# Altium PCB Tablet_Design.PcbDoc (part 5 of 6)
Units mil, origin at the board's own origin, x right, y up, seen from the top; angles counter-clockwise.
Board outline 3823 x 4035 mil, 2 copper layers (Top Layer, Bottom Layer), stack 57 mil thick; 254 components, 256 nets, 1099 pads, 445 vias.
Unrouted connection lines stored in the file: 188.
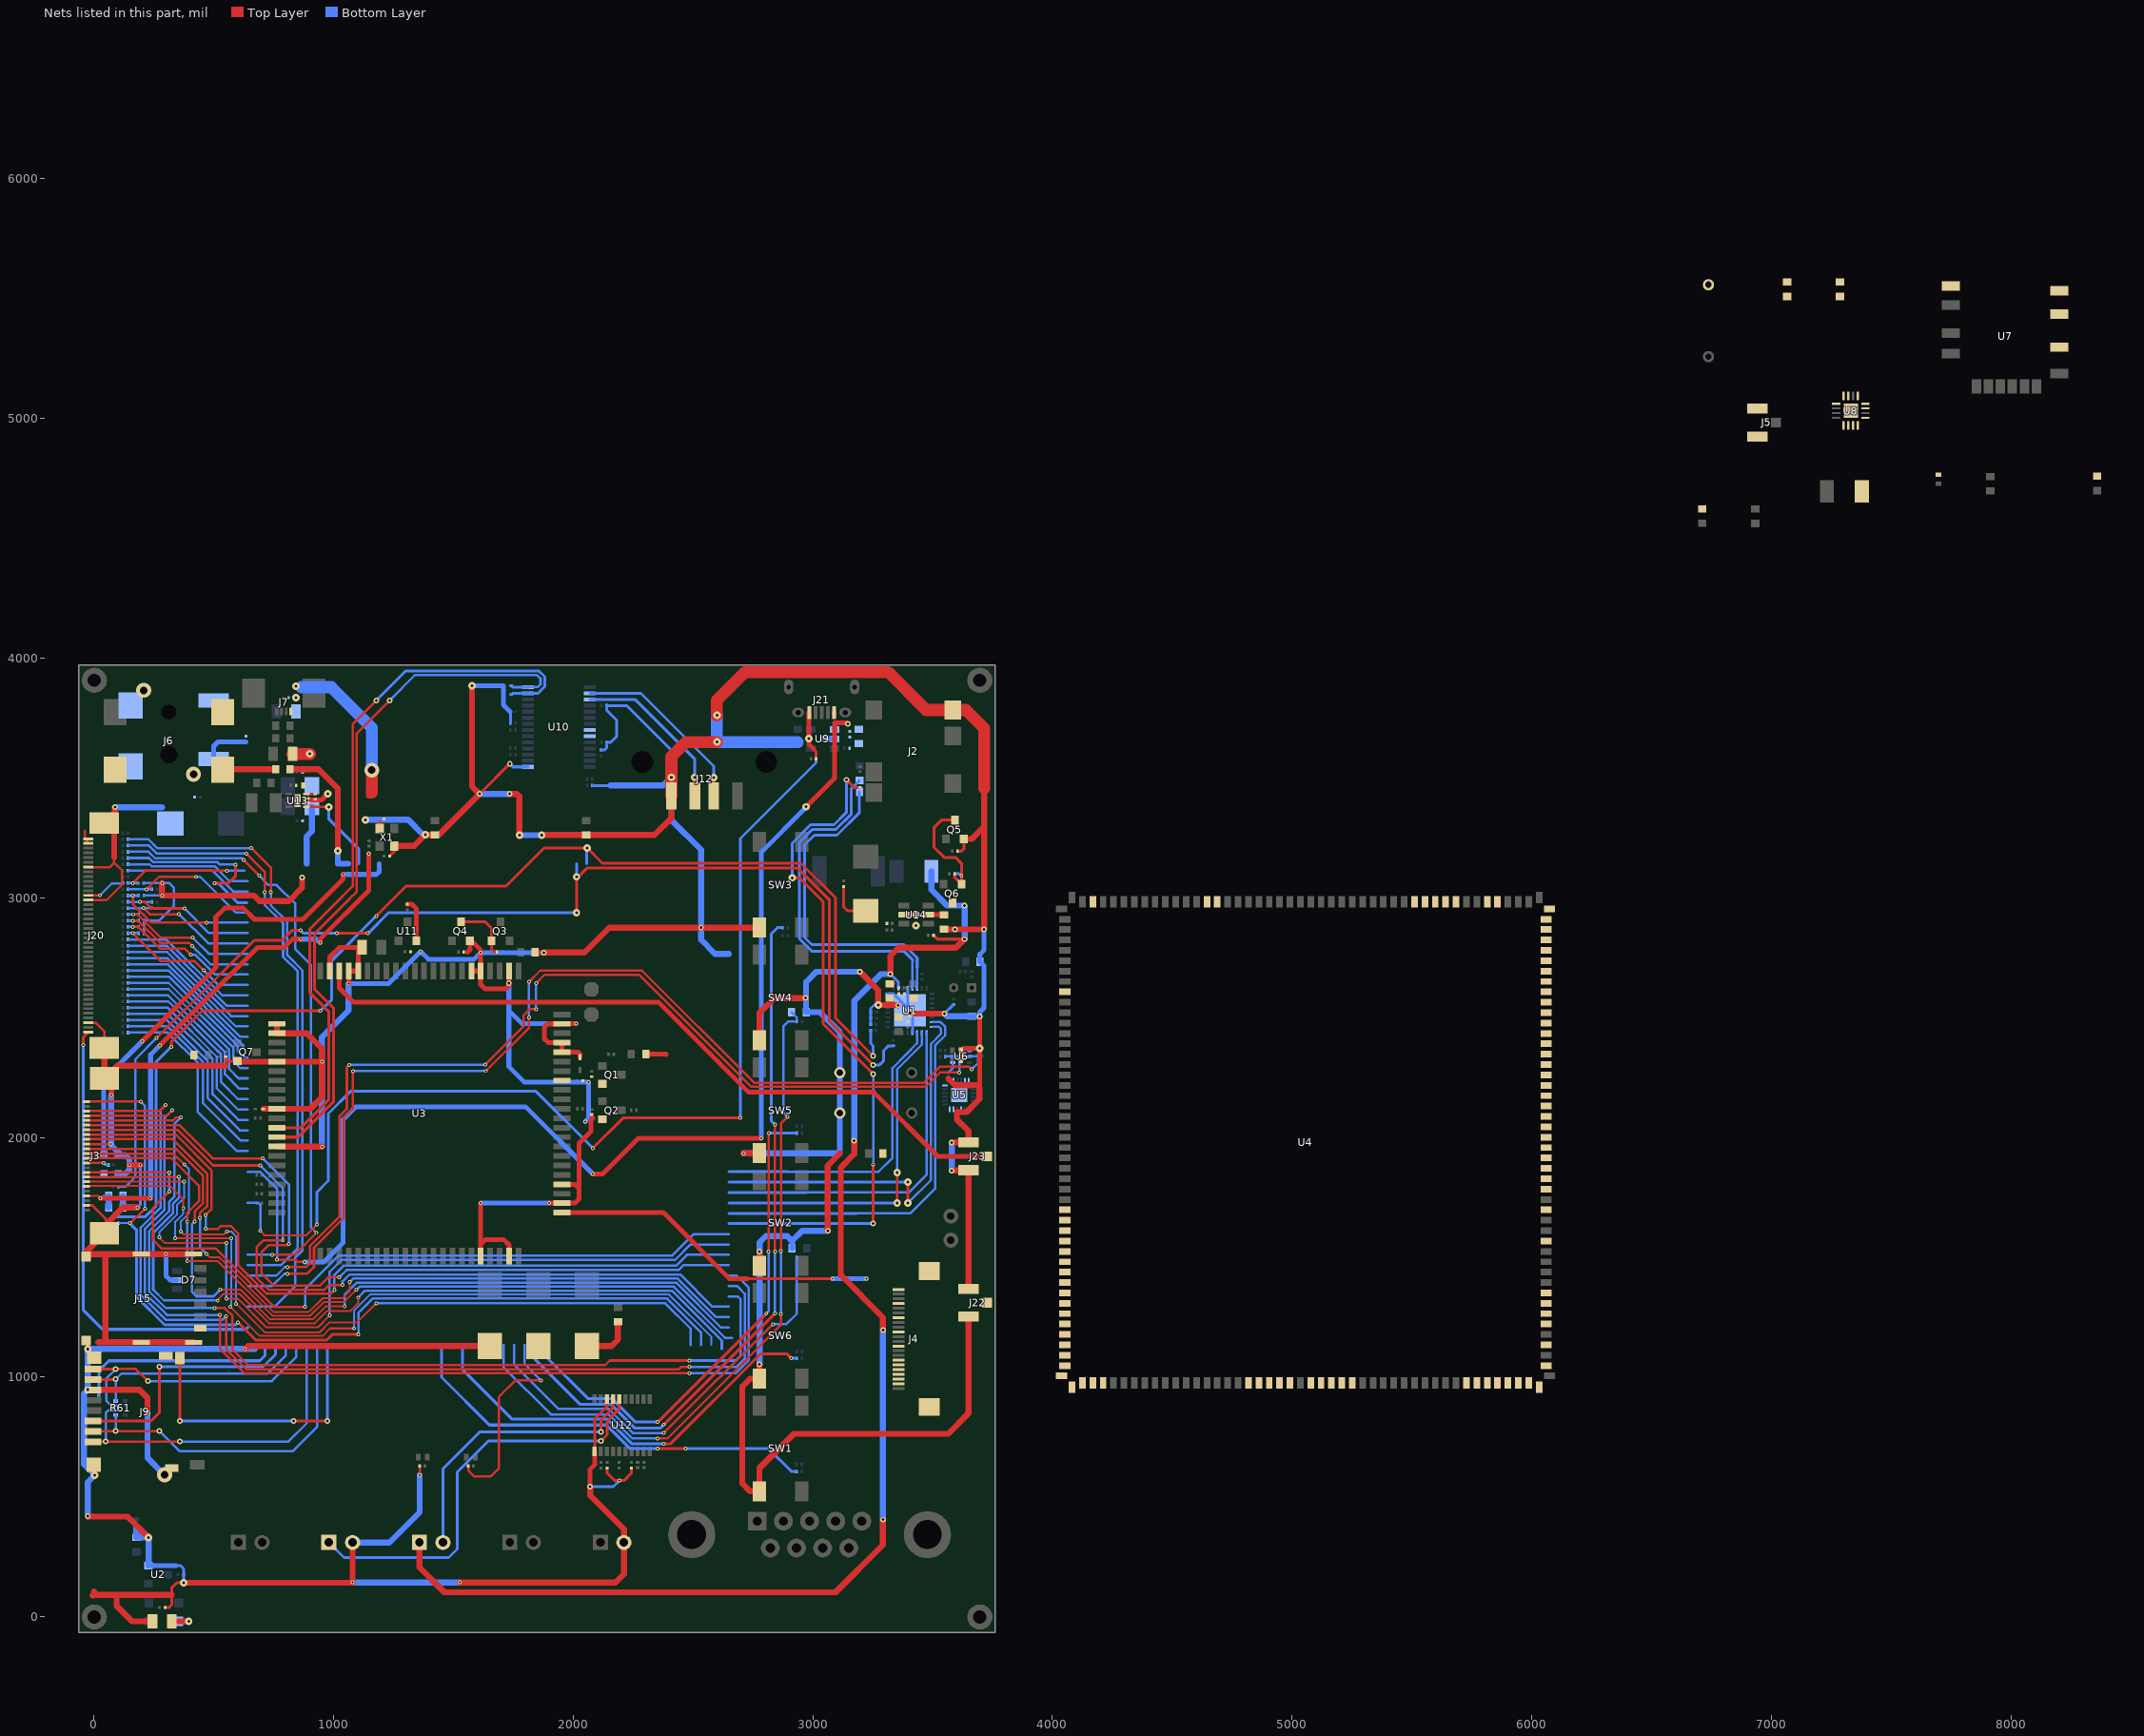
[diagram p2: the nets of this part, all layers, seen from the top]

## Via types
v1: diameter 15.75, hole 7.87, Top Layer to Bottom Layer, tented both sides, 264 vias
v2: diameter 23.62, hole 11.81, Top Layer to Bottom Layer, tented both sides, 101 vias
v3: diameter 31.5, hole 11.81, Top Layer to Bottom Layer, tented both sides, 73 vias
v4: diameter 62.99, hole 31.5, Top Layer to Bottom Layer, tented both sides, 7 vias

## Nets (pads, with @x,y where several pads share a name; then routed paths per layer and width w, separated by ;. In a path a pad name is that pad's centre, name@x,y a point inside that pad or via, vN(x,y) a via of type N, cw(c..) or ccw(c..) an arc to the next point about the centre after c; other vN are vias at no path point) (continued)
GND: (continued)
  Top Layer w12: C13.2@297.81,38 313,38 325.25,50.25 325.25,91.57 325.25,121.25 346,142 v3(375,142) ; 551,2317 551,2328 560.4,2318.6 Q7.2@599.63,2318.6 ; C65.1@1234.81,3174 1253.51,3192.7 X1.2@1253.51,3215.58 ; v2(1610,3432.83) 1610,3433 v2(1736,3559) ; U12.1@2089.84,689.75 2089.84,824.84 2141.02,876.02 U12.18@2141.02,908.25 ; C80.2@2141.19,621.19 2141.19,600.81 2174,568 v1(2193,568) 2212,568 2243.39,599.39 C81.2@2243.39,621.19 ; 3002.5,3621.5 3013.83,3610.17 R68.2@3013.83,3580 ; C91.2@3129,3046.19 3129,2961 3145,2945 C90.2@3221,2945 ; R132.2@3603.66,3194 3620,3194 3630.07,3204.07 Q5.2@3630.07,3244.63
  Top Layer w20: 896,3408 951,3408 v3(977,3434) ; U3.80@984.78,2694 984.78,2752.78 1025,2793 C28.2@1120,2793.04 ; v1@1063.52,2641 U3.78@1063.52,2694 U3.77@1102.89,2694 1102.89,2775.93 C28.2@1120,2793.04 ; C28.2@1120,2793.04 C28.2@1120,2793.04 ; 1147.2,3425.53 1148,3424.73 ; X1.4@1192.49,3288.42 1192.49,3310.3 ; C78.2@1309,2972.81 1327.19,2972.81 1346.4,2953.6 U11.2@1346.4,2820.63 ; 1559,2772 1569.4,2782.4 Q4.2@1569.4,2820.63 1575.37,2820.63 1614.7,2781.3 v1(1614.7,2771) U3.64@1614.7,2694 ; U3.65@1575.33,2694 U3.64@1614.7,2694 ; U3.37@1614.7,1505.02 1614.7,1554 ; v1@1614.7,1725 1614.7,1554 ; U3.40@1732.81,1505.02 1732.81,1551.19 1710,1574 1634.7,1574 1614.7,1554 ; v2@1732.81,2633.81 1719,2620 1632,2620 1614.7,2637.3 U3.64@1614.7,2694 ; v2@1732.81,2643 U3.61@1732.81,2694 ; C27.1@1842,2772 1843,2771 v2(1878,2771) ; v1(1900,1725.5) U3.41@1953.28,1725.5 2007.5,1725.5 2024,1742 2024,1787.17 ; U3.43@1953.28,1804.24 2006.94,1804.24 2024,1787.17 ; v1(2013,2474) 1953.76,2474 U3.60@1953.28,2473.53 1893.53,2473.53 1880,2460 1880,2411 1896.21,2394.79 U3.58@1953.28,2394.79 U3.57@1953.28,2355.42 2020.58,2355.42 2028,2348 D3.2@2028,2334.57 ; v2(2071,543) 2071,615 2089.57,633.57 U12.1@2089.57,689.75 ; 2074,2070.64 2074,2024 2024,1974 2024,1787.17 ; 2078,2084 2082.68,2079.32 ; J21.5@2983.02,3772.7 v3(2983.02,3663) 2983.02,3640.98 3002.5,3621.5 ; C38.1@3618.74,2322 C39.1@3618.74,2362 3628.74,2372 v3(3696.31,2372) ; 3696.31,2207.06 v3(3696.31,2372) ; v2(3696.31,2505) v3(3696.31,2372)
  Top Layer w25: J15.MP1@-31.98,1502.86 -31.98,1523.35 J3.MP1@44.84,1600.17 44.84,1630.84 49.69,1635.69 121,1707 v1(182,1707) ; J15.MP1@-27,1512.86 49,1512.86 ; v2(-25,419) -4.98,419 -3.55,417.57 141.43,417.57 v3(228,331) v3@228,329 ; -4.98,89 0.45,89 ; J9.6@-3.55,946.57 190.43,946.57 224,913 v2(224,851) ; 0.45,104.57 13.45,91.57 95,91.57 ; 19.14,1145.14 50,1145.14 ; J20.MP1@44.84,2372.05 J3.MP2@44.84,2245.83 ; v1(73,2177) 73,2217.67 J3.MP2@44.84,2245.83 ; 85,3169 85,3270.47 J20.MP2@43.93,3311.54 88.59,3356.2 v2(88.59,3377) ; v1(149,1884) v1(194,1884) ; J26.2@245,-19 159,-19 95,45 95,91.57 ; v1(284.98,3061) v1(285,3009) 668,3009 691,2986 814,2986 869,3041 v2(869,3084) ; 325.25,91.57 95,91.57 ; v3(375,142) 1079.63,142 v1(1079.63,143.37) J19.2@1079.63,310 ; J15.MP4@417.6,1145.14 J15.MP5@198.31,1145.14 50,1145.14 ; J15.MP3@417.6,1512.86 J15.MP2@198.31,1512.86 49,1512.86 ; 550,2299 98,2299 J3.MP2@44.84,2245.83 ; Q7.2@599.63,2318.6 602.18,2316.05 U3.5@764.31,2316.05 v1@952,2316.05 ; v1(631,1116) 644.46,1129.46 C24.2@1652,1129.46 ; D9.2@709.73,2119.2 U3.10@764.31,2119.2 903.2,2119.2 952,2168 v1(952,2315) v1@952,2316.05 ; U3.1@764.31,2473.53 U3.2@764.31,2434.16 888.84,2434.16 952,2371 v1@952,2316.05 ; U3.14@767.02,1961 v1(952,1961) ; v3@840,3838 v3(843,3835) ; 1147.2,3425.53 1160,3438.32 ; X1.2@1253.51,3215.58 1336.58,3215.58 v3(1383,3262) C61.2@1423,3262 1439.17,3262 v2(1610,3432.83) 1577.89,3464.94 v3(1577.89,3884.11) ; v1(1527,143.37) 2176.37,143.37 2211.87,178.87 J17.2@2211.87,310 2211.87,365.13 2071,506 v2(2071,543) ; v2(1735.83,3432.83) 1765.69,3432.83 1776,3422.52 v3(1776,3261) ; v3(1869,3261) 1870,3262 C62.2@2055,3262 2340,3262 2409.87,3331.87 J12.4@2409.87,3425.06 ; v2(1878,2771) 2047,2771 2151,2875 v2(2534,2875) 2534.13,2874.87 SW3.1@2777.42,2874.87 ; C25.2@2057.42,1129.46 2160.46,1129.46 2187,1156 C22.2@2187,1230 ; v1@2711,1934.07 SW5.1@2777.42,1934.07 ; SW2.1@2777.42,1463.67 2777.42,1523.42 v2(2778,1524) ; SW4.1@2777.42,2404.47 2777.42,2519.42 2839,2581 v2(2970,2581) ; v2(2778,1053) 2777.42,1052.42 SW6.1@2777.42,993.27 2738.27,993.27 2706,961 2706,556 2739.13,522.87 SW1.1@2777.42,522.87 2777.42,620.42 2920,763 3564,763 3649.65,848.65 J22.3@3649.65,1251.93 ; v2@3062,1610 3062,1882 3113,1933 ; v2(3197,2691) 3273,2615 v3(3273,2552) 3355,2552 v2(3356,2551) ; U14.2@3379.82,2929 v3(3431,2929) ; v3(3405.87,2517.87) 3407.75,2516 v2(3548.83,2516) ; C89.2@3548,2868 v2(3594,2868) v2@3714,2868 ; 3565,2246 3594,2217 3685.31,2217 3695.78,2206.53 3695.78,2159.78 3641.39,2105.39 3601.31,2105.39 3601.31,2074.69 3649.65,2026.35 J23.2@3649.65,1979.07 3580.07,1979.07 v2(3580,1979) ; v2@3580.07,1862.07 J23.3@3649.65,1862.07 ; Q5.2@3630.07,3244.63 3662.63,3244.63 3715,3297 ; J22.2@3649.65,1368.07 J23.3@3649.65,1862.07 ; J23.3@3649.65,1862.93 J23.3@3649.65,1862.07 ; v2@3715,2869 3715,3297 ; 3715,3457 3715,3297 ; 49,1512.86 49,1146.14 50,1145.14
  Top Layer w50: J8.2@829,3600 v3(902,3600) ; 1160,3438.32 v4(1160,3532) ; J12.4@2409.87,3425.06 2409.87,3587.87 2471.28,3649.28 v3(2600,3649.28) ; v3(2600,3761) 2600,3824 2717.51,3941.51 3314.49,3941.51 3473,3783 J2.1@3584,3783 3639,3783 3715,3707 3715,3457
  Bottom Layer w10: C83.2@208.81,3061 v1(284.98,3061) 315,3061 335,3041 335,2967 272,2904 R101.2@208.83,2904 R99.2@208.83,2878 R97.2@208.83,2852 ; R103.2@208.83,3009 v1(285,3009) ; 3565,2270 3584.79,2289.79 U6.4@3584.79,2312.41
  Bottom Layer w12: v1(182,1707) 194,1719 v1(194,1884) ; 343,214 361,214 374.81,200.19 C14.2@374.81,176 374.81,142.19 v3(375,142) ; v2(1736,3559) 1749.34,3545.66 U10.15@1812.06,3545.66 ; C64.2@1737.19,3775.98 1738.17,3774.99 R75.2@1738.17,3728 ; v2(2071,543) 2168,543 v1(2193,568) ; R70.1@2079.65,3468 2156,3468 ; C60.2@2117,3616.81 2131.81,3616.81 2140.81,3625.81 C63.2@2140.81,3648 2157,3648 2181,3672 2181,3741 2139.83,3782.17 R71.1@2139.83,3801.57 2223.43,3801.57 2410,3615 v3(2410,3502) ; R7.1@3242.06,2473.1 C8.1@3242.06,2497.45 C10.1@3242.06,2521.79 3242.06,2538.06 3256,2552 v3(3273,2552) ; U1.24@3313.35,2598.68 3336.98,2598.68 U1.33@3396.03,2539.63 ; U1.28@3396.03,2622.31 U1.33@3396.03,2539.63 ; v3(3405.87,2517.87) U1.33@3405.87,2529.79 U1.33@3396.03,2539.63 ; U1.12@3415.72,2437.27 U1.33@3415.72,2517.87 ; v2(3548.83,2516) R3.2@3588,2555.17
  Bottom Layer w20: U2.2@228.63,214 343,214 ; v1(301,1513) 301,1422 318,1405 D7.2@346.82,1405 ; v1(1063,2641) 1230,2641 v1(1364,2775) 1396,2743 1586.7,2743 v1(1614.7,2771) v2(1878,2771) ; v3@1577.89,3884 D11.2@1708.46,3884 D10.2@1708.46,3847 1708.46,3804.7 C64.2@1737.19,3775.98 ; v1@1615.5,1725.5 v1(1900,1725.5) ; v2(1732,2643) 1732,2529 ; v1(2013,2474) 1787,2474 1732,2529 ; v1(2050,2066) 2065,2081 v1(2065,2231) 1796,2231 1732,2295 1732,2529 ; U6.1@3653.69,2363.59 3662.1,2372 v3(3696.31,2372) ; v2(3696.31,2505) 3696.31,2522.31 3714,2540 3714,2716 C1.2@3697,2733 3697,2764 3715,2782 v2(3715,2868)
  Bottom Layer w25: v2(-25,419) -25,562 v3(4,591) -41.25,636.25 -41.25,931.75 v2(-25,948) v3(-25,1117.06) 671.59,1117.06 ; v1@72,1967 C31.2@102,1937 ; v1(72,1972.21) v1@72,2177 ; v2(88.59,3377) 286,3377 ; C32.2@102,1846 130,1846 149,1865 v1(149,1884) 149,1907 130,1926 C31.2@102,1926 ; C29.2@122,1756 C30.2@122,1707 v1(182,1707) ; C54.2@178,370.5 C53.2@178,331 v3(228,331) ; v2(224,851) 224,663 v4(295,592) ; U2.2@228.63,213.4 228.63,214 v3@228.63,329 ; 888.13,3141.94 888.13,3255.13 910,3277 C84.2@910,3380 ; v1(952,1961) v1(952,2315) 952,2418 1063,2529 v1(1063,2641) ; v1(1079.63,143.37) v1(1527,143.37) ; J19.2@1079.63,310 1233,310 1360,437 v1(1360,591) ; v3(1133,3325) 1312,3325 v3@1375,3262 ; v2(1610,3432.83) v2(1735.83,3432.83) ; v3(1776,3261) v3(1869,3261) ; 2156,3468 2376,3468 v3(2410,3502) 2410,3324 2533.8,3200.2 2533.8,3141.94 2533.8,2824.2 2592.05,2765.95 2649.94,2765.95 ; v1@2710,1933 v1(2711,1933) 3113,1933 C36.1@3113,2101.5 C37.1@3113,2270 3113,2439 3030,2522 C34.1@2972,2522 2972,2648 3015,2691 v2(3197,2691) ; v2(2778,1053) v2(2778,1524) 2778,1562 2804,1588 2893,1588 2914,1567 ; C33.1@2914,1538 2914,1567 ; 3039,3662 U9.2@3090.21,3662 ; v2(3063,1610) 2956,1610 2914,1568 2914,1567 ; v2(3548.83,2516) 3559.83,2505 C2.2@3663,2505 v2(3696.31,2505) ; v2(3580,1862) v2(3580,1979)
  Bottom Layer w50: 867,3878 991,3878 1160,3709 v4(1160,3532) ; v3(2600,3761) v3(2600,3649.28) C57.2@2937,3649.28
  other v1: 1614.5,1725.5
  other v3: 3430,2884 843,3882
  other v4: 208,3865
GNSS_ANT: J23.1 U3.79 | length 3063.5
  Top Layer w20: U3.79@1024.15,2694 1024.15,2623.85 1085,2563 2357,2563 2732,2188 3255,2188 3522,1921 J23.1@3726.35,1921
GPIO.GPIOA29: R29.2 U4.166 | length 1778.6
  Top Layer w12: v1(2353,701) v1(2469,701)
  Bottom Layer w12: 1451.12,1134.06 1451.12,999.88 1651,800 2139,800 2238,701 v1(2353,701) ; v1(2469,701) 2816,701 2911,606 R29.2@2932.35,606
GPIO.GPIOB10: R37.2 U4.164 | length 1788.1
  Top Layer w12: v1(2379,722) 2407,722 2781,1096 2893,1096 v1(2911,1078)
  Bottom Layer w12: 1537.73,1134.06 1537.73,1032.27 1746,824 2142,824 2244,722 v1(2379,722) ; v1(2911,1078) R37.2@2933.17,1078
HP_OUT_L: C11.1 U1.30 | length 1388.6
  Bottom Layer w10: U1.30@3435.4,2622.31 3435.4,2709
  Bottom Layer w12: C11.1@3195,3441 3195,3355 3101,3261 3006,3261 2966,3221 2966,2834 2996,2804 3380,2804 3435.4,2748.6 3435.4,2709
HP_OUT_R: C12.1 U1.29 | length 1448.4
  Bottom Layer w10: U1.29@3415.72,2622.31 3415.72,2733
  Bottom Layer w12: C12.1@3195,3489 3175.5,3469.5 3175.44,3469.5 3169,3463.06 3169,3463 3161,3455 3161,3349 3097,3285 2999,3285 2944,3230 2944,2829 2996,2777 3380,2777 3415.72,2741.28 3415.72,2733
HUB_D3.HUB_DM3: U7.2 U10.8
HUB_D3.HUB_DP3: U7.3 U10.9
HUB_DM1: D10.1 U3.12 U10.27 | length 3036.1
  Top Layer w10: 1040,3008 1080,3048 1080,3724 v2(1179,3823)
  Top Layer w12: U3.12@764.31,2040.46 864.46,2040.46 980,2156 980,2525 902,2603 902,2870 1040,3008
  Bottom Layer w12: v2@1179,3824 1301,3946 1857.46,3946 1882,3921.46 1882,3881.33 1853.42,3852.75 U10.27@1812.06,3852.75 1747.28,3852.75 D10.1@1741.54,3847
HUB_DM2: J12.2 U10.2 | length 766.8
  Top Layer w12: J12.2@2587.03,3425.06 v3(2587.03,3501.71)
  Bottom Layer w12: U10.2@2069.94,3852.75 2283.25,3852.75 2587.03,3548.97 v3(2587.03,3501.71)
HUB_DP1: D11.1 U3.13 U10.28 | length 2967.1
  Top Layer w10: 1066,2994 1097,3025 1097,3686 v2(1234,3823)
  Top Layer w12: U3.13@764.31,2001.09 852.09,2001.09 1001,2150 1001,2538 921,2618 921,2849 1066,2994
  Bottom Layer w10: v2(1234,3823) 1339,3928 1850,3928 1864,3914 1864,3890 1852.34,3878.34 U10.28@1812.06,3878.34
  Bottom Layer w12: D11.1@1741.54,3884 1747.2,3878.34 U10.28@1812.06,3878.34
HUB_DP2: J12.3 U10.3 | length 693.7
  Top Layer w12: v3(2508,3502) 2508,3425.35 J12.3@2508.29,3425.06
  Bottom Layer w12: U10.3@2069.94,3827.16 2257.84,3827.16 2508,3577 v3(2508,3502)
IMU_INT: U5.12 U8.9
L_DCLK: J20.30 R119.1 | length 165.4
  Top Layer w10: J20.30@-23,3009.57 v1(25.57,3009.57)
  Bottom Layer w10: v1(25.57,3009.57) 25.68,3009.57 75.23,3059.13 119.38,3059.13 R119.1@121.17,3060.92
LCD_B0: R97.1 R109.2 U4.35 | length 612.8
  Top Layer w10: v1(163,2851.84) 279.84,2735 421,2735 v1(459,2697)
  Bottom Layer w10: R109.2@142.83,2851.84 v1(163,2851.84) R97.1@187.17,2851.84 ; v1(459,2697) 519.97,2636.03 642.06,2636.03
LCD_B1: R99.1 R110.2 U4.36 | length 605.7
  Top Layer w10: v1(163,2878) 185.96,2878 275.96,2788 379,2788 v1(405,2762)
  Bottom Layer w10: R110.2@142.83,2877.97 R99.1@187.17,2878 ; v1(405,2762) 423.04,2762 505.7,2679.34 642.06,2679.34
LCD_B2: R101.1 R111.2 U4.37 | length 592.4
  Top Layer w10: v1(163,2904) 184,2904 277,2811 399,2811 v1(411,2799)
  Bottom Layer w10: R111.2@142.83,2904.11 181,2904.11 ; v1(411,2799) 487.35,2722.65 642.06,2722.65
LCD_B3: R89.1 R112.2 U4.38 | length 590.5
  Top Layer w10: v1(164,2930.24) 181.99,2930.24 279.23,2833 v1(413,2833)
  Bottom Layer w10: R112.2@142.83,2930.24 v1(164,2930.24) R89.1@187.17,2930.24 ; v1(413,2833) 480.05,2765.95 642.06,2765.95
LCD_B4: R91.1 R113.2 U4.39 | length 594.4
  Top Layer w10: v1(208,2956.38) 208.62,2956.38 234,2931 v1(356,2931)
  Bottom Layer w10: R113.2@142.83,2956.38 v1(208,2956.38) R91.1@241.8,2956.38 ; R91.1@241.83,2956 R91.1@241.83,2956.35 ; v1(356,2931) 477.74,2809.26 642.06,2809.26
LCD_B5: R93.1 R114.2 U4.40 | length 603.5
  Top Layer w10: v1(192,2982.51) 212.49,2982.51 240,2955 v1(378.87,2955)
  Bottom Layer w10: R114.2@142.83,2982.51 v1(192,2982.51) 241.66,2982.51 241.83,2982.35 R93.1@241.83,2982 ; v1(378.87,2955) 378.87,2954.69 481,2852.57 642.06,2852.57
LCD_B6: R103.1 R115.2 U4.41 | length 590.3
  Top Layer w10: v1(163,3008) 163,2973.27 240.27,2896 v1(471,2896)
  Bottom Layer w10: R115.2@142.83,3008.65 186.82,3008.65 R103.1@187.17,3009 ; v1@471,2895.87 642.06,2895.87
LCD_B7: R95.1 R116.2 U4.42 | length 603.4
  Top Layer w10: v1(220,3034.78) 272.27,3087.05 v1(426,3087.05)
  Bottom Layer w10: R116.2@142.83,3034.78 v1(220,3034.78) R95.1@240.78,3034.78 ; v1(426,3087.05) 443.95,3087.05 592,2939 642.24,2939 642.06,2939.18
LCD_CLK: C83.1 R119.2 U4.46 | length 528.8
  Top Layer w10: v1(163,3060.92) 214.08,3112 v1(556,3112)
  Bottom Layer w10: R119.2@142.83,3060.92 v1(163,3060.92) 185.11,3060.92 C83.1@185.19,3061 ; v1(556,3112) 627.65,3112 628.06,3112.41
LCD_DE: R117.2 U4.43 | length 773.5
  Top Layer w12: v1(505,3060) 561,3060 592,3091 v1@592,3137
  Bottom Layer w10: R117.2@142.83,3165.46 230.5,3165.46 247.96,3148 516,3148 526,3138 v1(592,3138)
  Bottom Layer w12: v1(505,3060) 519,3060 600,2979 638.57,2979
LCD_G0: R98.2 U4.27 | length 679.6
  Bottom Layer w10: R98.2@142.83,2644.43 312.57,2644.43 583,2374 583,2317 610.43,2289.57 642.06,2289.57
LCD_G1: R100.2 U4.28 | length 651.3
  Bottom Layer w10: R100.2@142.83,2670.31 312.69,2670.31 600,2383 600,2362 629.12,2332.88 642.06,2332.88
LCD_G2: R102.2 U4.29 | length 617.7
  Bottom Layer w10: R102.2@142.83,2696.18 310.86,2696.18 623.81,2383.23 623.81,2376.19
LCD_G3: R104.2 U4.30 | length 624.2
  Bottom Layer w10: R104.2@142.83,2721.16 309.94,2721.16 611.6,2419.5 642.06,2419.5
LCD_G4: R105.2 U4.31 | length 617.1
  Bottom Layer w10: R105.2@142.83,2747.3 307.84,2747.3 592.34,2462.8 642.06,2462.8
LCD_G5: R106.2 U4.32 | length 610
  Bottom Layer w10: R106.2@142.83,2773.43 305.75,2773.43 573.07,2506.11 642.06,2506.11
LCD_G6: R107.2 U4.33 | length 602.9
  Bottom Layer w10: R107.2@142.83,2799.57 304.29,2799.57 554.43,2549.42 642.06,2549.42
LCD_G7: R108.2 U4.34 | length 595.7
  Bottom Layer w10: R108.2@142.83,2825.7 302.19,2825.7 535.17,2592.72 642.06,2592.72
LCD_HSYNC: R120.2 U4.44 | length 535.4
  Bottom Layer w10: R120.2@142.83,3113.19 493.81,3113.19 581.2,3025.8 642.06,3025.8
LCD_R0: R85.2 U4.19 | length 824
  Bottom Layer w10: R85.2@142.83,2437.14 307.86,2437.14 434,2311 434,2106 596.88,1943.12 642.06,1943.12
LCD_R1: R86.2 U4.20 | length 796.8
  Bottom Layer w10: R86.2@142.83,2463.06 306.9,2463.06 455,2314.96 455,2144 612.57,1986.43 642.06,1986.43
LCD_R2: R87.2 U4.21 | length 780.3
  Bottom Layer w10: R87.2@142.83,2488.98 305.02,2488.98 476,2318 476,2163 609.27,2029.73 642.06,2029.73
LCD_R3: R88.2 U4.22 | length 768.4
  Bottom Layer w10: R88.2@142.83,2514.91 308.09,2514.91 496,2327 496,2180 602.96,2073.04 642.06,2073.04
LCD_R4: R90.2 U4.23 | length 752.1
  Bottom Layer w10: R90.2@142.83,2540.83 308.74,2540.83 513,2336.57 513,2205 601.65,2116.35 642.06,2116.35
LCD_R5: R92.2 U4.24 | length 735.8
  Bottom Layer w10: R92.2@142.83,2566.76 311.24,2566.76 530,2348 530,2232 602.35,2159.65 642.06,2159.65
LCD_R6: R94.2 U4.25 | length 714.5
  Bottom Layer w10: R94.2@142.83,2592.68 310.27,2592.68 547,2355.96 547,2264 608.04,2202.96 642.06,2202.96
LCD_R7: R96.2 U4.26 | length 700.9
  Bottom Layer w10: R96.2@142.83,2618.56 312.44,2618.56 565,2366 565,2285 603.73,2246.27 642.06,2246.27
LCD_SIG.LCD_VSYNC: R121.2 U4.45 | length 528.3
  Bottom Layer w10: R121.2@142.83,3139.32 232.59,3139.32 240.92,3131 504.31,3131 566.21,3069.1 642.06,3069.1
LVDS_VDD: C5.1 C6.1 C89.1 J18.1 L6.2 Q6.3 R128.2 U1.26 U14.5 | length 5802.1
  Top Layer w12: C6.1@3321,2641 3339.81,2641 ; R128.2@3503.83,2843 3519.83,2827 v2@3624,2827
  Top Layer w20: U14.5@3482.18,2929 3547,2929 C89.1@3548,2928
  Top Layer w25: J18.1@1358.61,310 1358.61,206.39 1463,102 3095,102 3293,300 v2(3293,405) ; v2(3173,1986) 3173,1931 3117,1875 3117,1425 3293,1249 v2(3293,1196) ; v2(3324,2681) 3324,2757 3358,2791 3597,2791 v2(3633,2827)
  Bottom Layer w12: v2(3324,2681) 3356.66,2648.34 U1.26@3356.66,2622.31
  Bottom Layer w25: v2(3173,1986) 3173,2569.68 3284.31,2681 v2(3324,2681) ; v2(3293,405) v2@3293,1195 ; L6.2@3494.83,3110 3494.83,3033.17 3561,2967 v2(3633,2967) ; v2@3633.5,2827 v2@3633.5,2963.5
MAIN_ANT: J22.1 U3.82 | length 1385.1
  Top Layer w12: 2728,1410 v1(3082,1410)
  Top Layer w20: U3.82@1953.28,1686.13 2376.87,1686.13 2653,1410 2728,1410
  Bottom Layer w20: v1(3082,1410) v1(3224,1410)
MCU_BACKLIGHT_PWM: J20.1 U4.2 | length 1889.5
  Top Layer w12: v1(-43,2385) -43,2418.71 J20.1@-23,2438.71
  Bottom Layer w12: v1(-43,2385) -43,1279 37,1199 634.17,1199 642.06,1206.9
MCU_CAM1_MCLK: J3.13 U4.142 | length 3365.9
  Top Layer w8: v1(364,1607) 376,1595 543,1595 v1(555,1607) ; v1(594,1306) 713.04,1186.96 942.96,1186.96 984,1228 1099,1228 v1(1179,1308)
  Top Layer w10: J3.13@-30.95,1932.84 -28.96,1930.85 334.15,1930.85 v1(378,1887)
  Bottom Layer w8: v1(364,1607) 364,1650 395.92,1681.92 395.92,1869.08 v1(378,1887) ; v1(555,1607) 574,1607 594,1587 v1(594,1306)
  Bottom Layer w10: v1(1179,1308) 2385,1308 2490.49,1202.51 2490.49,1134.06
MCU_HP_DET: R9.2 U4.127 | length 2833.4
  Top Layer w12: v3(2914,3083) 2944,3083 3043,2984 3043,2474 v2(3252,2265) ; v2(3140,3492) 3172.17,3459.83 R9.2@3197,3459.83 ; v2(3252,1640) v1(3252,1886)
  Bottom Layer w10: v1(3252,1886) v2(3252,2265)
  Bottom Layer w12: 2649.94,1639.97 v2@3250.97,1639.97 ; v3(2914,3083) 2914,3226.87 2991.13,3304 3089.13,3304 3140,3354.87 v2(3140,3492) ; v2@3251,2264 v2(3252,2265)
MCU_I2C.MCU_SCL_0: J4.20 R4.1 R25.2 U4.78 | length 4917.4
  Top Layer w10: v1(262.5,2414.5) 530,2682
  Top Layer w12: 530,2682 670,2822 786,2822 827,2863 v1(863,2863) ; v1@1018,2851 v1(1144,2851) ; v3(2014,2938) 2014,3079 2058,3123 2937,3123 3070,2990 3070,2484.5 v2(3252,2302.5)
  Bottom Layer w10: R25.2@102.83,1794.05 132.05,1794.05 173.5,1835.5 173.5,2325.5 v1(262.5,2414.5)
  Bottom Layer w12: v1(863,2863) 875,2851 v1(1015,2851) ; v1(1144,2851) 1231,2938 v3(2014,2938) ; v3@2014,3079 v3(2014,3087) 2014,3141.83 2014.11,3141.94 ; v2(3252,2302.5) 3278.5,2302.5 3295,2319 3295,2361 3316,2382 R4.1@3336.69,2382
MCU_I2C.MCU_SDA_0: J4.21 R5.1 R26.2 U4.79 | length 5075.1
  Top Layer w12: v1(323,2378) 323,2398.47 452.53,2528 v1(944,2528) ; v1(1179,2924) 1303,3048 1720,3048 1879,3207 v3(2059,3207) 2122,3144 2950.31,3144 3094,3000.31 3094,2498 v2(3252,2340)
  Bottom Layer w12: R26.2@102.83,1669 215.54,1669 260,1713.46 260,2315 v1(323,2378) ; v1(944,2528) 946,2528 993,2575 993,2738 v1(1179,2924) ; 2057.42,3141.94 2057.42,3205.42 v3(2059,3207) ; R5.1@3242.05,2445.79 3242.05,2390.95 3252,2381 v2(3252,2340)
MCU_I2S.MCU_I2S_BCK: U1.8 U4.123 | length 1657.7
  Top Layer w12: v3(3397,1726) v3(3397,1813.2)
  Bottom Layer w10: v3(3397,1726) 3493,1822 3493,2390.04 3535,2432.04 3535,2452 3526.11,2460.89 U1.8@3498.39,2460.89
  Bottom Layer w12: 2649.94,1813.2 v3(3397,1813.2)
MCU_I2S.MCU_I2S_LRCK: U1.7 U4.126 | length 1658.1
  Bottom Layer w10: 3183.28,1683.28 3407.28,1683.28 3510,1786 3510,2383 3553,2426 3553,2461 3533.43,2480.57 U1.7@3498.39,2480.57
  Bottom Layer w12: 2649.94,1683.28 3183.28,1683.28
MCU_I2S.MCU_I2S_MCLK: U1.11 U4.122 | length 1272
  Bottom Layer w10: 2899,1856.5 3274.5,1856.5 3333,1915 3333,2289.04 3393,2349.04 3393,2350 3435.4,2392.4 U1.11@3435.4,2437.27
  Bottom Layer w12: 2649.94,1856.5 2899,1856.5
MCU_I2S.MCU_I2S_SDIN: U1.9 U4.124 | length 1448.9
  Bottom Layer w10: 2973,1769.89 3400.89,1769.89 3474.77,1843.77 U1.9@3474.77,2437.27
  Bottom Layer w12: 2649.94,1769.89 2973,1769.89
MCU_I2S.MCU_I2S_SDOUT: U1.10 U4.125 | length 1456.3
  Top Layer w10: v3(3352,1726) v3(3352,1854)
  Bottom Layer w10: v3(3352,1854) 3352,2284 3455.09,2387.09 U1.10@3455.09,2437.27
  Bottom Layer w12: 2649.94,1726.58 3351.42,1726.58 v3(3352,1726)
MCU_KEY.MCU_KEY_VOLDN: R35.2 U4.156 | length 2144.2
  Top Layer w10: v1(2815,1524) 2816.37,1525.37 v1(2816.37,2018)
  Top Layer w12: v1(2353,812) v1(2806,1265)
  Bottom Layer w10: v1(2806,1265) 2815,1274 v1(2815,1524)
  Bottom Layer w12: 1884.19,1134.06 1884.19,1087.81 2061,911 2161.04,911 2260.04,812 v1(2353,812) ; v1@2816,2018 v1(2816.37,2018) R35.2@2933,2018
MCU_KEY.MCU_KEY_VOLUP: R32.2 U4.157 | length 3025.6
  Top Layer w10: v1@2841,2054 2842,2053 v1(2842,1524)
  Top Layer w12: v1(2379,802) v1(2842,1265)
  Bottom Layer w10: v1(2842,1265) v1(2842,1524)
  Bottom Layer w12: 1840.88,1134.06 1840.88,1074.12 2028,887 2157,887 2256,788 2365,788 v1(2379,802) ; v1(2842,2054) 2826,2070 2826,2848 2853,2875 R32.2@2873.17,2875
MCU_KEY.MCU_PWR_KEY: C34.2 R33.2 U4.160 | length 2943.8
  Top Layer w10: v1(2353,744) 2393,744 2714.96,1065.96 2867,1218 v1(2867,1264) ; v1(2867,1525) 2867,2058 v1(2895,2086)
  Bottom Layer w10: 1710.96,1134.06 1710.96,1040.04 1907,844 2147.46,844 2247.46,744 v1(2353,744) ; v1(2867,1264) v1(2867,1525) ; v1(2895,2086) 2878,2103 2878,2463.8 2898.2,2484 R33.2@2933.17,2484 2933.17,2500.83 C34.2@2912,2522
MCU_KEY.MCU_RESETIN: R30.2 U4.159 | length 1814.9
  Top Layer w10: v1(2379,767) 2832,1220 v1(2835,1220)
  Bottom Layer w10: 1754.27,1134.06 1754.27,1051.73 1939,867 2149,867 2249,767 v1@2374,767 ; v1(2835,1220) 2889,1220 2933.17,1264.17 R30.2@2933.17,1499
MCU_NRESETOUT: R124.2 U4.4 | length 2692.3
  Top Layer w10: v1(657.06,3207) 739,3125.06 v1(739,3022)
  Bottom Layer w10: R124.2@142.83,3243.86 227.68,3243.86 264.54,3207 v1(657.06,3207) ; 642.06,1293.51 754.51,1293.51 840.13,1379.13 840.13,1497.17 871,1528.04 871,2696.04 807,2760.04 807,2900.04 739,2968.04 v1(739,3022)
MCU_OTG_PWRON: R67.2 U4.14 | length 4447.5
  Top Layer w8: v1(694.87,1610) 713.75,1591.13 886.13,1591.13 v1(931,1636)
  Top Layer w12: v1(2082,1955) 2208,2081 v1(2698,2081)
  Bottom Layer w10: 642.06,1726.58 686.54,1726.58 694.87,1718.24 v1(694.87,1610)
  Bottom Layer w12: v1(931,1636) 931,1771 979,1819 979,2099.71 1071.29,2192 1845,2192 v1(2082,1955) ; v1(2698,2081) 2698,3093.51 2698.56,3094.07 2698.56,3130.75 2698,3131.3 2698,3247 3013.83,3562.83 R67.2@3013.83,3579
MCU_PWREN_SYS: U4.57 U13.1 | length 381.7
  Top Layer w10: U13.1@886.42,3378.43 v3(980,3378.43)
  Bottom Layer w12: v3(980,3378.43) 980,3329 1104.66,3204.34 1104.66,3141.94
MCU_SCL_1: R122.2 U4.9 | length 2522.4
  Top Layer w10: v1(625,3157) v1(690,3092) ; v1(745,1510) 837,1510 v1(929,1602)
  Bottom Layer w10: R122.2@142.83,3191.59 228.41,3191.59 255,3165 617,3165 v1(625,3157) ; 642.06,1510.05 642.11,1510 v1(745,1510) ; v1(690,3092) 729,3053 763,3053 841,2975 841,2785 907,2719 907,1641 907,1624 v1(929,1602)
MCU_SCL_2: R40.1 U4.7 U5.23 U6.5 U8.12 | length 4311.8
  Top Layer w10: v1(807,1459) 887.11,1459 902,1473.89 902,1547.04 937.08,1582.13 937.23,1582.13 1026,1670.89 1026,2090.04 1056,2120.04 1056,2293.5 v1(1065,2302.5) ; v1(1634,2303) 1793,2462 1793,2509.11 1818.89,2535 v1(1846,2535) ; v1(1846,2644) 1881,2679 2275,2679 2743,2211 3471.04,2211 3530.54,2270.5 3610.81,2270.5 v1(3611.31,2270)
  Bottom Layer w10: 642.06,1423.43 706,1423.43 761.43,1423.43 797,1459 v1(807,1459) ; v1(1065,2302.5) 1065.5,2303 v1(1634,2303) ; v1(1846,2535) v1(1846,2644) ; R40.1@3553.07,2336 3555.07,2338 U6.5@3584.79,2338 3603.31,2338 3611.31,2330 v1(3611.31,2270)
MCU_SD0.MCU_SD0_CD: "J9.*CD Switch" U4.177 | length 1194.4
  Top Layer w12: v2(359.45,816) 359.45,1079.43 ; v2(834,816) v2@972,816
  Bottom Layer w12: v2(359.45,816) v2(834,816) ; v2(974.74,816) 974.74,1134.06 975,1134.32
MCU_SD0.MCU_SD0_CLK: R60.1 U4.183 | length 867.7
  Bottom Layer w12: R60.1@21,922.83 21,1026 63,1068 693,1068 714.9,1089.9 714.9,1134.06
MCU_SD0.MCU_SD0_CMD: J9.3 U4.182 | length 1028.5
  Top Layer w12: J9.3@-3.55,816.65 238.65,816.65 274,852 v2(274,1043)
  Bottom Layer w12: v2(274,1043) 707,1043 758.2,1094.2 758.2,1134.06
MCU_SD0.MCU_SD0_D0: J9.7 R61.8 U4.181 | length 980.1
  Top Layer w12: J9.7@-3.55,989.87 v2@92,989.87
  Bottom Layer w10: R61.8@92,900.68 v2(92,991) 116,1015 726,1015 801.51,1090.51 801.51,1134.06
MCU_SD0.MCU_SD0_D1: J9.8 R61.7 U4.180 | length 1157.4
  Top Layer w10: v2(92,1034) 175,1034 v2(226,983)
  Top Layer w12: J9.8@-3.55,1033.18 v2@92,1033.18
  Bottom Layer w10: R61.7@92,881 73,881 53,901 53,995 v2(92,1034) ; v2(226,983) 743,983 844.82,1084.82 844.82,1134.06
MCU_SD0.MCU_SD0_D2: J9.1 R61.6 U4.179 | length 1415.5
  Top Layer w10: J9.1@-2.58,731 v2(50,731) v2@359,731
  Bottom Layer w10: v2(50,731) 50,851 60.31,861.31 R61.6@92,861.31 ; v2@359,731 v2(359.45,731) 812,731 888.13,807.13 888.13,1134.06
MCU_SD0.MCU_SD0_D3: J9.2 R61.5 U4.178 | length 1419.4
  Top Layer w10: J9.2@-2.55,774.34 v2@91.34,774.34 ; v2(92,775) v2@273,775
  Bottom Layer w10: v2(92,775) R61.5@92,841.63 ; v2(273,776) 358,691 831,691 931.43,791.43 931.43,1134.06
MCU_SDA_1: R123.2 U4.8 | length 2482.1
  Top Layer w10: v1(637,3184) 713,3108 v1(713,3022)
  Bottom Layer w10: R123.2@142.83,3217.73 229.77,3217.73 263.5,3184 v1(637,3184) ; 642.06,1466.74 642.55,1466.25 780.21,1466.25 850.87,1536.92 850.87,2692.13 790,2753 790,2893 713,2970 v1(713,3022)
MCU_SDA_2: R38.1 U4.6 U5.24 U6.2 U8.13 | length 4394.6
  Top Layer w10: v1(807,1431) 890.04,1431 919,1459.96 919,1540 944.13,1565.13 944.27,1565.13 1043,1663.85 1043,2083 1081,2121 v1(1081,2276) ; v1(1636,2277) 1642.13,2283.13 1642.23,2283.13 1653.87,2294.77 1653.87,2294.87 1816,2457 v1(1816,2500) v1@1816,2504 ; v1(1816,2649) 1863,2696 2287,2696 2755,2228 3464,2228 3530,2294 3653,2294 v1(3663,2284)
  Bottom Layer w10: 642.06,1380.13 744.13,1380.13 795,1431 v1(807,1431) ; v1(1081,2276) 1082,2277 v1(1636,2277) ; v1(1816,2500) v1(1816,2649) ; U6.2@3653.69,2338 3687.41,2338 R38.1@3689.41,2340 3689.41,2310.41 v1(3663,2284)
MCU_SEN0_INT: R82.1 U4.158 | length 849.6
  Top Layer w10: R82.1@1562.42,629 1562.42,610.58 1588,585 1655.96,585 1690,619.04 1690,917 1759,986 v1(1866,986)
  Bottom Layer w10: 1797.57,1134.06 1797.57,1054.43 v1(1866,986)